# Altium PCB Test Power Module PCB.PcbDoc
Units mm, origin at the board's own origin, x right, y up, seen from the top; angles counter-clockwise.
Board outline 100 x 45 mm, 2 copper layers (Top Layer, Bottom Layer), stack 1.57 mm thick; 13 components, 6 nets, 24 pads, 0 vias.
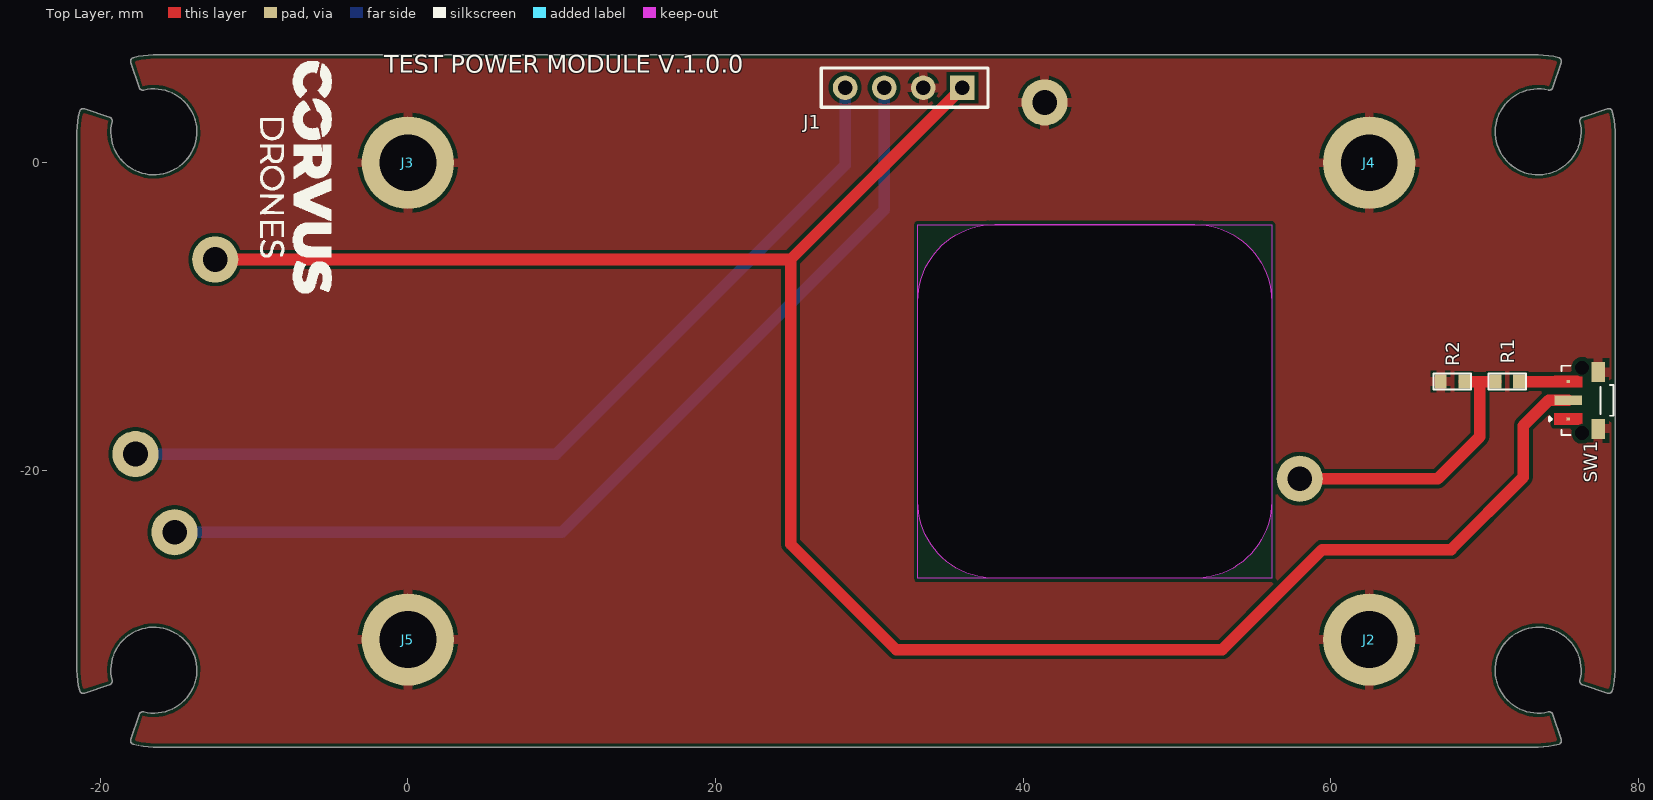
[diagram p0: Top Layer view]
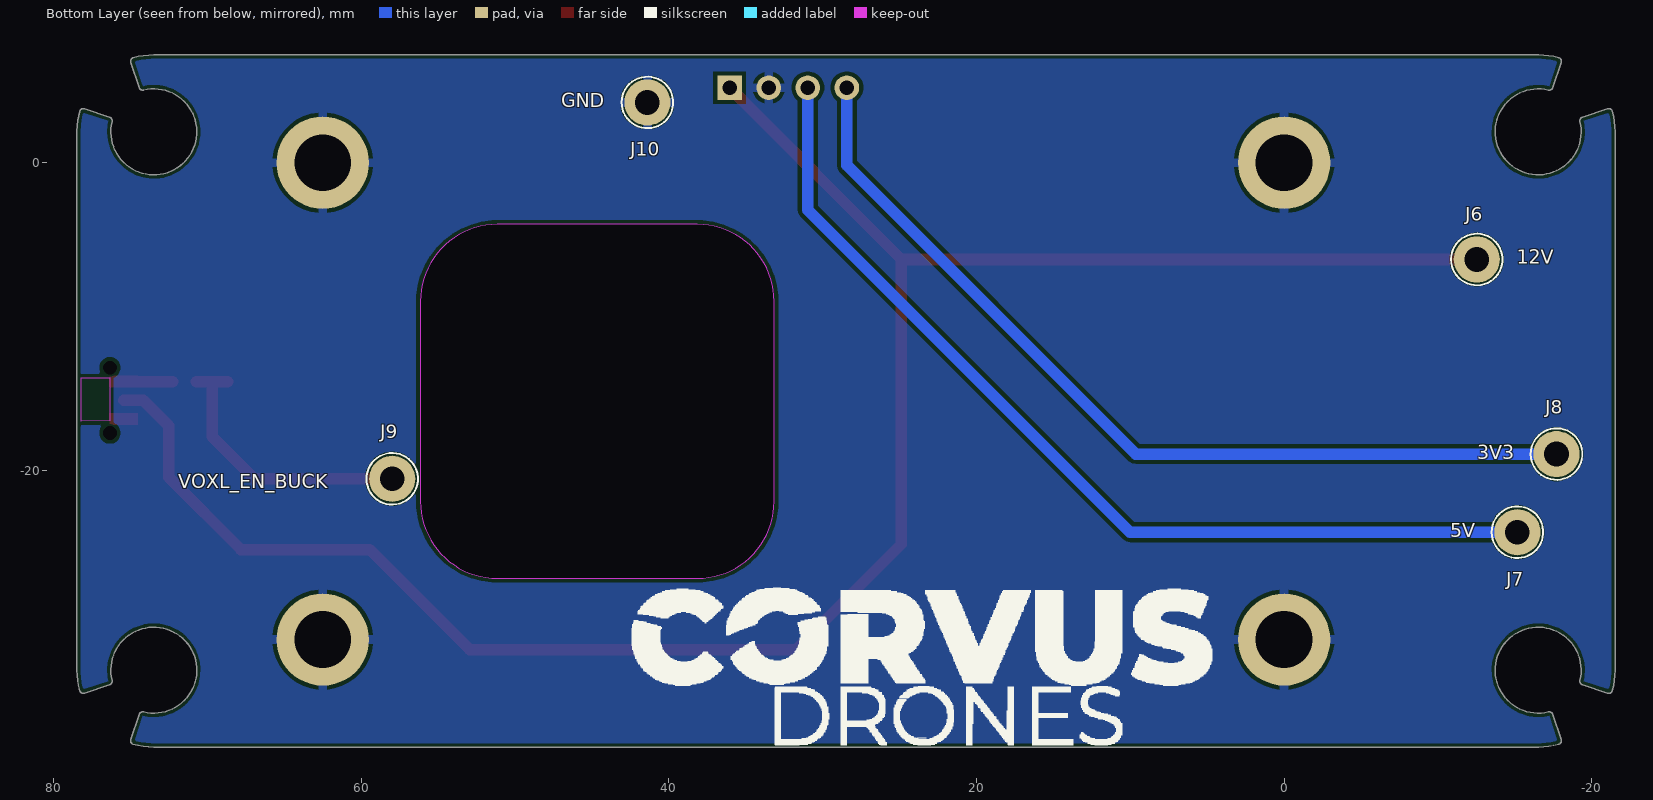
[diagram p1: Bottom Layer view, seen from below]
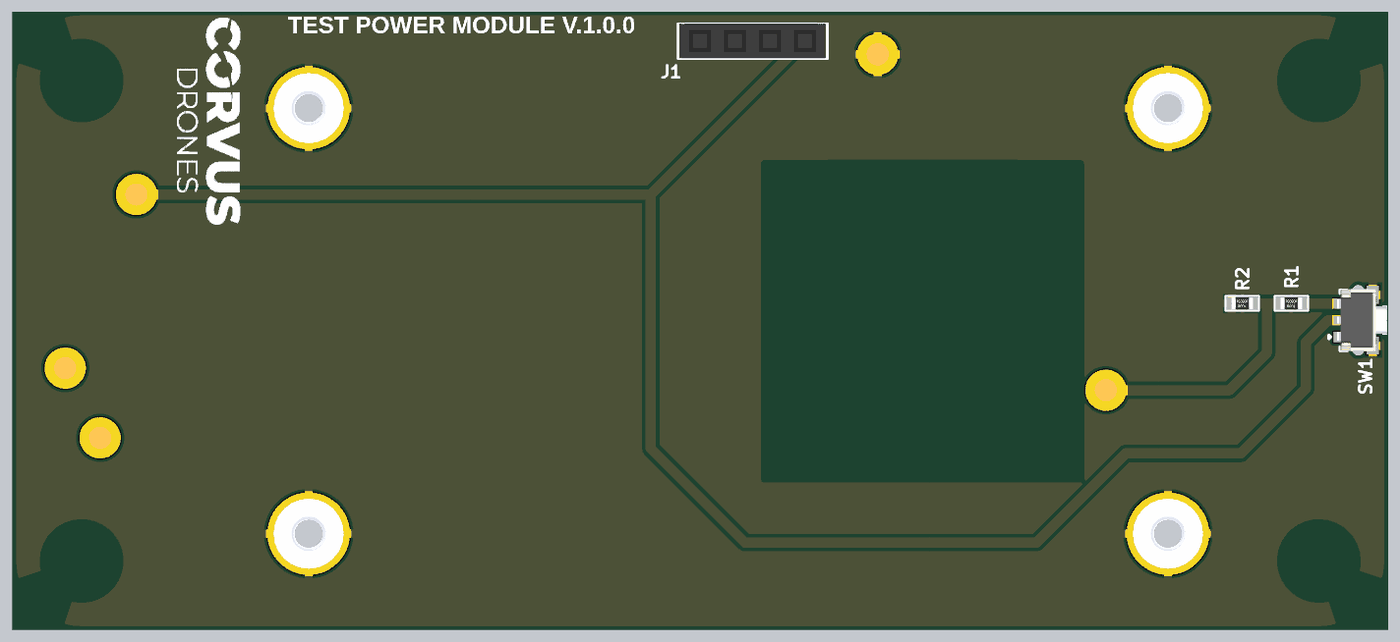
[diagram p2: 3D render of the assembled board from above, using the file's embedded part models]

## Layer stack, top to bottom
Top Solder: solder mask 0.01, Solder Resist, Dk 3.5
Top Layer: signal copper 0.035
Dielectric 1: dielectric 1.5, FR-4, Dk 4.8
Bottom Layer: signal copper 0.035
Bottom Solder: solder mask 0.01, Solder Resist, Dk 3.5

## Board outline
-21.019,-34.488 cw(c-21.098,-34.25) -21.339,-34.317 cw(c-16.52,-32.989) -21.519,-32.989 -21.519,2.011 cw(c-16.519,2.012) -21.339,3.34 cw(c-21.098,3.273) -21.019,3.511 -19.397,2.97 cw(c-19.476,2.733) -19.233,2.674 ccw(c-16.519,2.011) -13.955,0.901 -13.868,1.129 ccw(c-16.519,2.012) -17.181,4.726 cw(c-17.24,4.969) -17.478,4.89 -18.018,6.512 cw(c-17.781,6.591) -17.847,6.832 cw(c-16.518,2.012) -16.564,7.011 73.481,7.011 cw(c73.481,2.012) 74.82,6.829 cw(c74.743,6.591) 74.98,6.511 74.44,4.889 cw(c74.203,4.969) 74.15,4.724 74.13,4.729 ccw(c73.481,2.012) 72.598,-0.639 72.832,-0.706 ccw(c73.481,2.012) 76.195,2.674 cw(c76.438,2.733) 76.359,2.97 77.981,3.511 cw(c78.06,3.273) 78.303,3.335 cw(c73.481,2.012) 78.462,2.447 78.481,2.011 78.481,-32.989 cw(c73.481,-32.988) 78.295,-34.338 cw(c78.06,-34.25) 77.981,-34.488 76.359,-33.947 cw(c76.438,-33.71) 76.195,-33.651 ccw(c73.481,-32.988) 70.917,-31.878 70.83,-32.105 ccw(c73.481,-32.988) 74.143,-35.703 cw(c74.203,-35.946) 74.44,-35.867 74.98,-37.489 cw(c74.743,-37.568) 74.849,-37.794 74.851,-37.797 cw(c73.481,-32.988) 73.481,-37.988 -16.519,-37.988 -16.564,-37.988 cw(c-16.519,-32.989) -17.847,-37.809 cw(c-17.781,-37.568) -18.018,-37.489 -17.478,-35.867 cw(c-17.241,-35.946) -17.181,-35.703 ccw(c-16.519,-32.988) -13.868,-32.105 -13.955,-31.878 ccw(c-16.519,-32.988) -19.233,-33.651 cw(c-19.476,-33.71) -19.397,-33.947
cut-out: 33.148,-22.019 33.148,-9.011 cw(c38.148,-9.011) 38.148,-4.011 51.148,-4.011 cw(c51.148,-9.011) 56.148,-9.011 56.148,-22.019 cw(c51.148,-22.019) 51.148,-27.019 38.148,-27.019 cw(c38.148,-22.019)

## Design rules (kind name [scope] priority, off if disabled: settings)
BoardOutlineClearance [All] p1: gap=0 ignorepadtopadclearanceinfootprint=FALSE except(0.254: Poly-OutlineEdge)
Clearance [All] p1: gap=0.127 ignorepadtopadclearanceinfootprint=FALSE except(0.254: Arc-Poly Track-Poly SMDPad-Poly THPad-Poly Via-Poly Fill-Poly Poly-Poly Poly-Region)
DiffPairsRouting [All] p1: maxlimit=0.127 minlimit=0.127 mostfreqgap=0.127 toplayer_minwidth=0.203 toplayer_maxwidth=0.305 toplayer_prefwidth=0.203 bottomlayer_minwidth=0.203 bottomlayer_maxwidth=0.305 bottomlayer_prefwidth=0.203 maxuncoupledlength=12.7
HoleSize [All] p1: absolutevalues=TRUE maxlimit=25.4 minlimit=0.025 maxpercent=80.000 minpercent=20.000
HoleToHoleClearance [All] p1: gap=0.152 allowstackedmicrovias=TRUE
MinimumSolderMaskSliver [All] p1: minsoldermaskwidth=0
PolygonConnect [All] p1: connectstyle=Relief reliefconductorwidth=0.6 reliefentries=4 polygonreliefangle="90 Angle" airgapwidth=0.254
RoutingVias [All] p1: holewidth=0.3 width=0.6 viastyle="Through Hole" minholewidth=0.3 minwidth=0.6 maxholewidth=0.3 maxwidth=0.6
SilkToSilkClearance [All] p1: silktosilkclearance=0
SilkToSolderMaskClearance [IsPad] p1: minsilkscreentomaskgap=0 clearancetoexposedcopper=TRUE
SolderMaskExpansion SolderMaskExpansion_1 [IsVia] p1: expansion=0.102 istentingtop=TRUE
SolderMaskExpansion [All] p2: expansion=0.102 istentingtop=FALSE
UnRoutedNet [All] p1: checkbadconnections=TRUE
Width [All] p1: maxlimit=0.75 minlimit=0.254 preferedwidth=0.75 minimp=50.000000 maximp=50.000000 favimp=50.000000
23 further rules are at their usual default settings.

## Components (designator, comment, footprint, x,y, rotation, side; value= is the part's Value field where it differs from the comment)
J1 "C2718488" "HDR1X4 Female" 32.233,4.877 r180 top
J2 "9774050151R" SPACER 62.5,-31 r0 top
J3 "9774050151R" SPACER 0,0 r0 top
J4 "9774050151R" SPACER 62.5,0 r0 top
J5 "9774050151R" SPACER 0,-31 r0 top
J6 "YZ162317083P-01" YZ162317083P-01 -12.527,-6.289 r90 bottom
J7 "YZ162317083P-01" YZ162317083P-01 -15.169,-24.018 r180 bottom
J8 "YZ162317083P-01" YZ162317083P-01 -17.709,-18.938 r180 bottom
J9 "YZ162317083P-01" YZ162317083P-01 57.983,-20.549 r180 bottom
J10 "YZ162317083P-01" YZ162317083P-01 41.392,3.92 r180 bottom
R1 "30K" RES-0603 71.474,-14.223 r0 top
R2 "10K" RES-0603 67.906,-14.223 r0 top value=10kR
SW1 "TL3340AF160QG" TL3340AF160QG 76.412,-15.448 r90 top

## Footprints (in the part's own frame and the unit in brackets; to place one, negate y for a bottom-side part, rotate by r counter-clockwise, add the part's x,y. Pads: shape width x height; smd on the part's side, far side on the other; paste and mask are expansions set on the pad)
"HDR1X4 Female" [mm]
  rect 1.6x1.6 hole 0.95: 1(-3.81,0)
  round 1.6 hole 0.95: 2(-1.27,0) 3(1.27,0) 4(3.81,0)
  silkscreen extent -5.49,-1.27 5.36,1.27, body extent -5.38,-1.3 5.28,1.24, height 8.5
RES-0603 [mil]
  rect 30x35 smd: 1(-30,0) 2(30,0)
  silkscreen extent -48,-21 48,21, body extent -31,-17 31,17, height 18
SPACER [mm]
  round 6 hole 3.7: 1(0,0)
  body extent -2.55,-2.55 2.55,2.55, height 5.2
TL3340AF160QG [mm]
  rect 0.2x0.2 smd paste-1 mask+0: 1(-1.225,0.975) 3(1.225,0.975)
  rect 0.6x1.8 smd: 2(0,0.975)
  rect 1.3x0.9 smd: S1(-1.85,-0.975) S2(1.85,-0.975)
  round 0 hole 0.9 unplated: ""(-2.125,0.075) ""(2.125,0.075)
  Top Layer region: 1.6,0.375 1.6,0.365 1.595,0.358 1.587,0.343 1.579,0.327 1.572,0.311 1.569,0.302 1.565,0.292 1.557,0.271 1.551,0.25 1.545,0.228 1.543,0.218 1.54,0.209 1.536,0.191 1.533,0.173 1.531,0.155 1.53,0.146 1.53,0.146 1.529,0.138 1.526,0.12 1.525,0.102 1.525,0.084 1.525,0.075 0.85,0.075 0.85,1.875 1.6,1.875
  Top Layer region: -0.85,0.075 -1.525,0.075 -1.525,0.084 -1.525,0.102 -1.526,0.12 -1.529,0.138 -1.53,0.146 -1.53,0.146 -1.531,0.155 -1.533,0.173 -1.536,0.191 -1.54,0.209 -1.543,0.218 -1.545,0.228 -1.551,0.25 -1.557,0.271 -1.565,0.292 -1.569,0.302 -1.572,0.311 -1.579,0.327 -1.587,0.343 -1.595,0.358 -1.6,0.365 -1.6,0.375 -1.6,1.875 -0.85,1.875
  silkscreen extent -2.25,-1.97 2.25,2.21, body extent -2.25,-2.05 2.25,1.62, height 3.3
YZ162317083P-01 [mm]
  round 3 hole 1.6: 1(0,0)
  silkscreen extent -1.68,-1.67 1.68,1.68, body extent -1,-1 1,1, height 5

## Part data
J1: "2.54mm Plugin 3A bronze -40℃~+105℃ Straight 1x4P Top 4 Square Holes Plugin,P=2.54mm Female Headers ROHS", MANUFACTURER=BOOMELE, Package=Plugin,P=2.54mm, ComponentLink1Description=LCSC, ComponentLink1URL=https://www.lcsc.com/product-detail/Female-Headers_BOOMELE-Boom-Precision-Elec-C2718488_C2718488.html, Item Type=Header, LCSC Part Number=C2718488, Manufacturer Part Number=C2718488
J2 J3 J4 J5: "Spacer Material: Steel Mounting: SMT Series: WA-SMSI Thread D: M2.5", MANUFACTURER="Wurth Electronics", Max Operating Temperature=150°C, Min Operating Temperature=-55°C, Supplier Part Number=732-7095-1-ND, Category="Spacers, Standoffs", ComponentLink1Description=http://www.farnell.com/datasheets/1960373.pdf?src-supplier=Farnell, ComponentLink1URL=http://www.farnell.com/datasheets/1960373.pdf?src-supplier=Farnell, ComponentLink2Description=http://www.mouser.com/ds/2/445/9774050151R-611428.pdf?src-supplier=Mouser, ComponentLink2URL=http://www.mouser.com/ds/2/445/9774050151R-611428.pdf?src-supplier=Mouser, ComponentLink3Description=https://media.digikey.com/pdf/Data%20Sheets/Wurth%20Electronics%20PDFs/WA-SMSx_Performance_Flyer.pdf?src-supplier=Digikey, ComponentLink3URL=https://media.digikey.com/pdf/Data%20Sheets/Wurth%20Electronics%20PDFs/WA-SMSx_Performance_Flyer.pdf?src-supplier=Digikey, ComponentLink4Description=http://www.farnell.com/datasheets/1960373.pdf?src-supplier=Element14, ComponentLink4URL=http://www.farnell.com/datasheets/1960373.pdf?src-supplier=Element14, ComponentLink5Description=https://datasheet.octopart.com/9774050151R-W%C3%BCrth-Elektronik-datasheet-48588545.pdf?src-supplier=Element14, ComponentLink5URL=https://datasheet.octopart.com/9774050151R-W%C3%BCrth-Elektronik-datasheet-48588545.pdf?src-supplier=Element14, ComponentLink6Description=http://www.farnell.com/datasheets/1960373.pdf?src-supplier=Newark, ComponentLink6URL=http://www.farnell.com/datasheets/1960373.pdf?src-supplier=Newark, ComponentLink7Description=https://katalog.we-online.de/em/datasheet/9774050151R.pdf?src-supplier=Digikey, ComponentLink7URL=https://katalog.we-online.de/em/datasheet/9774050151R.pdf?src-supplier=Digikey, Height=5.1mm, Item Type=Spacer, Length=0.252inch, Manufacturer Part Number=9774050151R, Material=Steel, Outside Diameter=0.201inch, Packaging=10Packaging, Plating=Tin, Pricing="1=1.16, 10=1.098, 50=0.979, 100=0.895 (USD)", Reach SVHC Compliant=Unknown, RoHS=Yes, Series=WA-SMSI, Stock=39400, Supplier=Digikey, Threaded/Unthreaded=Threaded
J6 J7 J8 J9 J10: "Brass 12V -40℃~+85℃ 单PINBit 弹簧顶针(POGO PIN) 8.3mm 50mΩ 10000次 4.28mm 2A Gold - Pogo Pin Spring Probe Connector ROHS", LCSC Part Number=C5157268, MANUFACTURER=Xinyangze, Package=-, ComponentLink1Description=LCSC, ComponentLink1URL=https://www.lcsc.com/product-detail/Pogo-Pin-Spring-Probe-Connector_Xinyangze-YZ162317083P-01_C5157268.html, Item Type="Pogo Pin Spring Probe Connector", Manufacturer Part Number=YZ162317083P-01
R1: library part RC0603FR-0730KL, "RES 30K OHM 1% 1/10W 0603", LCSC Part Number=C100001, Supplier Part Number 1=311-30.0KHRCT-ND, Supplier 1=Digi-Key
R2: library part RT0603BRD0710KL, "RES SMD 10K OHM 0.1% 1/10W 0603", Case/Package=0603, LCSC Part Number=C95204, MANUFACTURER=Yageo, Max Operating Temperature=155°C, Min Operating Temperature=-55°C, Package Height=0.45mm, Package Length=1.6mm, Package Style=SMTMeter, Package Width=0.8mm, Power=100mW, Rated Temperature=70°C, Resistor Type="FIXED RESISTOR", Supplier Part Number 1=1991391P, Temperature Coefficient=25ppm/°C, Tolerance=0.1%, Working Voltage=75V, Category="Chip SMD Resistors", ComponentLink1Description=https://datasheet.ciiva.com:443/pdfs/VipMasterIC/IC/YAGO/YAGO-S-A0008510989/YAGO-S-A0008510989-1.pdf?src-supplier=IHS+Markit, ComponentLink1URL=https://datasheet.ciiva.com:443/pdfs/VipMasterIC/IC/YAGO/YAGO-S-A0008510989/YAGO-S-A0008510989-1.pdf?src-supplier=IHS+Markit, ComponentLink2Description=https://datasheet.ciiva.com/5624/pyu-rt-1-to-0-05-rohs-l-4-5624351.pdf?src-supplier=Mouser, ComponentLink2URL=https://datasheet.ciiva.com/5624/pyu-rt-1-to-0-05-rohs-l-4-5624351.pdf?src-supplier=Mouser, ComponentLink3Description=https://datasheet.ciiva.com/29721/pyu-rt-1-to-0-05-rohs-l-4-29721177.pdf?src-supplier=Digi-Key, ComponentLink3URL=https://datasheet.ciiva.com/29721/pyu-rt-1-to-0-05-rohs-l-4-29721177.pdf?src-supplier=Digi-Key, Construction=Chip, Item Type=Resistor, Manufacturer Part Number=RT0603BRD0710KL, Mounting Technology="Surface Mount", Packaging="Tape and Reel", Pins=2, Pricing 1="100=0.29800, 250=0.27800, 500=0.25900, 1000=0.23700 (GBP)", Reach SVHC Compliant=Yes, RoHS=Yes, RoHS Compliant=Yes, Stock 1=20510, Supplier 1=Rs, Technology="THIN FILM", Termination=Wraparound
SW1: "SWITCH TACTILE SPST-NO 0.05A 12V", Case/Package=SMD/SMT, Color=White, Contact Current Rating=50mA, Contact Resistance=500mR, LCSC Part Number=C2886925, MANUFACTURER=E-Switch, Max Operating Temperature=85°C, Max Voltage Rating (DC)=12V, Min Operating Temperature=-35°C, Operating Force=160gf, Package Quantity=1, Supplier Part Number=EG4627CT-ND, Actuator Length=0.85mm, Actuator Material=Polyphthalamide, Actuator Type=Standard, Category="Tactile Switches", ComponentLink1Description=https://datasheet.ciiva.com/7637/tl3340-7637667.pdf?src-supplier=Element14, ComponentLink1URL=https://datasheet.ciiva.com/7637/tl3340-7637667.pdf?src-supplier=Element14, ComponentLink2Description=https://datasheet.ciiva.com/5284/tl3340-28153-5284108.pdf?src-supplier=Mouser, ComponentLink2URL=https://datasheet.ciiva.com/5284/tl3340-28153-5284108.pdf?src-supplier=Mouser, ComponentLink3Description=https://datasheet.ciiva.com/2900/p021301b-2900825.pdf?src-supplier=Digikey, ComponentLink3URL=https://datasheet.ciiva.com/2900/p021301b-2900825.pdf?src-supplier=Digikey, ComponentLink4Description=https://datasheet.ciiva.com/2900/p021301b-2900826.pdf?src-supplier=Digikey, ComponentLink4URL=https://datasheet.ciiva.com/2900/p021301b-2900826.pdf?src-supplier=Digikey, ComponentLink5Description=https://datasheet.ciiva.com/2900/p021301b-2900827.pdf?src-supplier=Digikey, ComponentLink5URL=https://datasheet.ciiva.com/2900/p021301b-2900827.pdf?src-supplier=Digikey, Contact Material="Stainless Steel,Silver", Contact Plating="Stainless Steel,Silver", Current Rating=50mA, Electrical Life=100000Cycles, Height=3.55mm, Housing Material=Polyphthalamide, Illumination Type=Non-Illuminated,Illuminated, Item Type="Tactile Switch", Lead Free=5697LeadFree, Manufacturer Part Number=TL3340AF160QG, Mechanical Life=100000Cycles, Mounting Technology="Surface Mount", Number of Positions=2NUMBER, Orientation="Right Angle", Packaging="Tape and Reel", Pricing="1=0.54, 10=0.521, 25=0.5016, 100=0.434, 250=0.39548, 500=0.36652, 1000=0.32795 (USD)", Reach SVHC Compliant=No, RoHS=Yes, RoHS Compliant=Yes, Series=TL3340, Size=3.3mm, Stock=110635, Supplier=Digikey, Switch Function=Off-Mom, Switch Travel=0.2mm, Termination="Gull Wing", Throw Configuration=SPST, Voltage Rating (DC)=12V

## Nets (pads, with @x,y where several pads share a name; then routed paths per layer and width w, separated by ;. In a path a pad name is that pad's centre, name@x,y a point inside that pad or via, vN(x,y) a via of type N, cw(c..) or ccw(c..) an arc to the next point about the centre after c; other vN are vias at no path point)
+3.3V: J1.4 J8.1 | length 58.9
  Bottom Layer w0.75: J8.1 9.637,-18.938 28.423,-0.152 J1.4
+5V: J1.3 J7.1 | length 62.8
  Bottom Layer w0.75: J7.1 10.018,-24.018 30.963,-3.073 J1.3
"+12V (VBATT)": J1.1 J6.1 SW1.2 | length 133.8
  Top Layer w0.75: J6.1 24.877,-6.289 ; J1.1 24.877,-6.289 ; SW1.2 74.166,-15.448 72.517,-17.097 72.517,-20.447 67.818,-25.146 59.436,-25.146 52.933,-31.649 31.734,-31.649 24.877,-24.791 24.877,-6.289
GND: J1.2 J2.1 J3.1 J4.1 J5.1 J10.1 R2.1 SW1.S1 SW1.S2 | length 0.2
  Top Layer w0.635: J10.1 J10.1@41.501,3.81
NetR1_2: R1.2 SW1.3 | length 3.2
  Top Layer w0.75: R1.2 SW1.3
VOXL_EN_BUCK: J9.1 R1.1 R2.2 | length 18.5
  Top Layer w0.75: J9.1 66.954,-20.549 69.69,-17.813 69.69,-14.223 ; R2.2 69.69,-14.223 ; R1.1 69.69,-14.223
pads on no net: SW1. SW1.1

## Polygon pours and split planes (outlines as drawn)
GND on Bottom Layer "GND_L02_P001" (solid, pour order 1): -21.019,-34.488 cw(c-21.098,-34.25) -21.339,-34.317 cw(c-16.52,-32.989) -21.519,-32.989 -21.519,2.011 cw(c-16.519,2.012) -21.339,3.34 cw(c-21.098,3.273) -21.019,3.511 -19.397,2.97 cw(c-19.476,2.733) -19.233,2.674 ccw(c-16.519,2.011) -17.181,4.726 cw(c-17.24,4.969) -17.478,4.89 -18.018,6.512 cw(c-17.781,6.591) -17.847,6.832 cw(c-16.518,2.012) -16.564,7.011 73.481,7.011 cw(c73.481,2.012) 74.82,6.829 cw(c74.743,6.591) 74.98,6.511 74.44,4.889 cw(c74.203,4.969) 74.15,4.724 74.13,4.729 ccw(c73.481,2.012) 76.195,2.674 cw(c76.438,2.733) 76.359,2.97 77.981,3.511 cw(c78.06,3.273) 78.303,3.335 cw(c73.481,2.012) 78.462,2.447 78.481,2.011 78.481,-32.989 cw(c73.481,-32.988) 78.295,-34.338 cw(c78.06,-34.25) 77.981,-34.488 76.359,-33.947 cw(c76.438,-33.71) 76.195,-33.651 ccw(c73.481,-32.988) 74.144,-35.703 74.143,-35.703 cw(c74.203,-35.946) 74.44,-35.867 74.98,-37.489 cw(c74.743,-37.568) 74.849,-37.794 74.851,-37.797 cw(c73.481,-32.988) 73.481,-37.988 -16.519,-37.988 -16.564,-37.988 cw(c-16.519,-32.989) -17.847,-37.809 cw(c-17.781,-37.568) -18.018,-37.489 -17.478,-35.867 cw(c-17.241,-35.946) -17.181,-35.703 ccw(c-16.519,-32.988) -19.233,-33.651 cw(c-19.476,-33.71) -19.397,-33.947
GND on Top Layer "GND_L01_P000" (solid, pour order 0): -21.019,-34.488 cw(c-21.098,-34.25) -21.339,-34.317 cw(c-16.52,-32.989) -21.519,-32.989 -21.519,2.011 cw(c-16.519,2.012) -21.339,3.34 cw(c-21.098,3.273) -21.019,3.511 -19.397,2.97 cw(c-19.476,2.733) -19.233,2.674 ccw(c-16.519,2.011) -17.181,4.726 cw(c-17.24,4.969) -17.478,4.89 -18.018,6.512 cw(c-17.781,6.591) -17.847,6.832 cw(c-16.518,2.012) -16.564,7.011 73.481,7.011 cw(c73.481,2.012) 74.82,6.829 cw(c74.743,6.591) 74.98,6.511 74.44,4.889 cw(c74.203,4.969) 74.15,4.724 74.13,4.729 ccw(c73.481,2.012) 76.195,2.674 cw(c76.438,2.733) 76.359,2.97 77.981,3.511 cw(c78.06,3.273) 78.303,3.335 cw(c73.481,2.012) 78.462,2.447 78.481,2.011 78.481,-32.989 cw(c73.481,-32.988) 78.295,-34.338 cw(c78.06,-34.25) 77.981,-34.488 76.359,-33.947 cw(c76.438,-33.71) 76.195,-33.651 ccw(c73.481,-32.988) 74.144,-35.703 74.143,-35.703 cw(c74.203,-35.946) 74.44,-35.867 74.98,-37.489 cw(c74.743,-37.568) 74.849,-37.794 74.851,-37.797 cw(c73.481,-32.988) 73.481,-37.988 -16.519,-37.988 -16.564,-37.988 cw(c-16.519,-32.989) -17.847,-37.809 cw(c-17.781,-37.568) -18.018,-37.489 -17.478,-35.867 cw(c-17.241,-35.946) -17.181,-35.703 ccw(c-16.519,-32.988) -19.233,-33.651 cw(c-19.476,-33.71) -19.397,-33.947

## Keep-outs
Top Layer:
  region: 33.148,-4.039 56.148,-4.039 56.148,-27.019 33.148,-27.019
Bottom Layer:
  region: 78.203,-16.805 78.203,-13.97 76.337,-13.97 76.337,-16.783

## Other copper
Top Layer:
  pour cut-out: 78.203,-16.648 76.35,-16.648 76.35,-14.248 78.203,-14.248

## Silkscreen, mask and mechanical layers (free items; w line width, h text height)
Top Overlay:
  drawing of 1844 lines, arcs and shapes, not listed
  text "TEST POWER MODULE V.1.0.0" at -1.524,5.461 h1.97
Bottom Overlay:
  drawing of 1844 lines, arcs and shapes, not listed
  text "GND" at 46.99,3.302 h1.52
  text "12V" at -15.113,-6.858 h1.52
  text "3V3" at -12.558,-19.558 h1.52
  text "VOXL_EN_BUCK" at 71.882,-21.463 h1.52
  text "5V" at -10.795,-24.638 h1.52
Dimensions:
  lines w0.152: 28.392,-22.875 cw(c29.027,-22.875) 29.027,-22.24 ; 28.392,-22.875 cw(c29.027,-22.875) 29.027,-22.24 ; 28.392,-22.875 ccw(c29.027,-22.875) 29.027,-23.51 ; 28.392,-22.875 ccw(c29.027,-22.875) 29.027,-23.51 ; 28.392,-20.335 cw(c29.027,-20.335) 29.027,-19.7 ; 28.392,-20.335 cw(c29.027,-20.335) 29.027,-19.7 ; 28.392,-20.335 ccw(c29.027,-20.335) 29.027,-20.97 ; 28.392,-20.335 ccw(c29.027,-20.335) 29.027,-20.97 ; 28.392,-17.795 cw(c29.027,-17.795) 29.027,-17.16 ; 28.392,-17.795 cw(c29.027,-17.795) 29.027,-17.16 ; 28.392,-17.795 ccw(c29.027,-17.795) 29.027,-18.43 ; 28.392,-17.795 ccw(c29.027,-17.795) 29.027,-18.43 ; 29.027,-23.51 54.427,-23.51 ; 29.027,-23.51 54.427,-23.51 ; 29.027,-22.24 54.427,-22.24 ; 29.027,-22.24 54.427,-22.24 ; 29.027,-20.97 54.427,-20.97 ; 29.027,-20.97 54.427,-20.97 ; 29.027,-19.7 54.427,-19.7 ; 29.027,-19.7 54.427,-19.7 ; 29.027,-18.43 54.427,-18.43 ; 29.027,-18.43 54.427,-18.43 ; 29.027,-17.16 54.427,-17.16 ; 29.027,-17.16 54.427,-17.16 ; 54.427,-23.51 ccw(c54.427,-22.875) 55.062,-22.875 ; 54.427,-23.51 ccw(c54.427,-22.875) 55.062,-22.875 ; 54.427,-22.24 cw(c54.427,-22.875) 55.062,-22.875 ; 54.427,-22.24 cw(c54.427,-22.875) 55.062,-22.875 ; 54.427,-20.97 ccw(c54.427,-20.335) 55.062,-20.335 ; 54.427,-20.97 ccw(c54.427,-20.335) 55.062,-20.335 ; 54.427,-19.7 cw(c54.427,-20.335) 55.062,-20.335 ; 54.427,-19.7 cw(c54.427,-20.335) 55.062,-20.335 ; 54.427,-18.43 ccw(c54.427,-17.795) 55.062,-17.795 ; 54.427,-18.43 ccw(c54.427,-17.795) 55.062,-17.795 ; 54.427,-17.16 cw(c54.427,-17.795) 55.062,-17.795 ; 54.427,-17.16 cw(c54.427,-17.795) 55.062,-17.795 ; 34.234,-25.415 cw(c34.869,-25.415) 34.869,-24.78 54.427,-24.78 cw(c54.427,-25.415) 55.062,-25.415 cw(c54.427,-25.415) 54.427,-26.05 34.869,-26.05 cw(c34.869,-25.415) 34.234,-25.415
  lines w0.5: 33.148,-4.039 33.148,-26.989 56.148,-26.989 56.148,-4.039 ; 33.148,-4.011 56.148,-4.011
Board_outline:
  lines w0.152: -21.519,-32.989 ccw(c-16.52,-32.989) -21.339,-34.317 ccw(c-21.098,-34.25) -21.019,-34.488 -19.397,-33.947 ccw(c-19.476,-33.71) -19.233,-33.651 cw(c-16.519,-32.988) -17.181,-35.703 ccw(c-17.241,-35.946) -17.478,-35.867 -18.018,-37.489 ccw(c-17.781,-37.568) -17.847,-37.809 ccw(c-16.519,-32.989) -16.564,-37.988 -16.519,-37.988 73.481,-37.988 ccw(c73.481,-32.988) 74.851,-37.797 74.849,-37.794 ccw(c74.743,-37.568) 74.98,-37.489 74.44,-35.867 ccw(c74.203,-35.946) 74.143,-35.703 cw(c73.481,-32.988) 76.195,-33.651 ccw(c76.438,-33.71) 76.359,-33.947 77.981,-34.488 ccw(c78.06,-34.25) 78.295,-34.338 78.295,-34.338 ccw(c73.481,-32.988) 78.481,-32.989 78.481,2.011 78.462,2.447 ccw(c73.48,2.012) 78.303,3.335 ccw(c78.06,3.273) 77.981,3.511 76.359,2.97 ccw(c76.438,2.733) 76.195,2.674 cw(c73.481,2.012) 74.13,4.729 74.15,4.724 ccw(c74.203,4.969) 74.44,4.889 74.98,6.511 ccw(c74.743,6.591) 74.82,6.829 ccw(c73.481,2.012) 73.481,7.011 -16.519,7.011 -16.564,7.011 ccw(c-16.518,2.012) -17.847,6.832 ccw(c-17.781,6.591) -18.018,6.512 -17.478,4.89 ccw(c-17.24,4.969) -17.181,4.726 cw(c-16.519,2.011) -19.233,2.674 ccw(c-19.476,2.733) -19.397,2.97 -21.019,3.511 ccw(c-21.098,3.273) -21.339,3.34 ccw(c-16.519,2.012) -21.519,2.011 -21.519,-32.989
  lines w0.254: 33.148,-22.019 ccw(c38.148,-22.019) 38.148,-27.019 51.148,-27.019 ccw(c51.148,-22.019) 56.148,-22.019 56.148,-9.011 ccw(c51.148,-9.011) 51.148,-4.011 38.148,-4.011 ccw(c38.148,-9.011) 33.148,-9.011 33.148,-22.019
Fabrication:
  drawing of 191 lines, arcs and shapes, not listed
  text "Layer" at 95.379,-4 h1.52
  text "Name" at 105.791,-4 h1.52
  text "Material" at 129.407,-4 h1.52
  text "Thickness" at 151.245,-4 h1.52
  text "Constant" at 167.75,-4 h1.52
  text "Board Layer Stack" at 182.225,-4 h1.52
  text "Top Overlay" at 105.791,-7.048 h1.52
  text "Top Solder" at 105.791,-10.096 h1.52
  text "Solder Resist" at 129.407,-10.096 h1.52
  text "0.010mm" at 151.245,-10.096 h1.52
  text "3.5" at 167.75,-10.096 h1.52
  text "1" at 95.379,-13.144 h1.52
  text "Top Layer" at 105.791,-13.144 h1.52
  text "0.035mm" at 151.245,-13.144 h1.52
  text "Dielectric 1" at 105.791,-16.192 h1.52
  text "FR-4" at 129.407,-16.192 h1.52
  text "1.500mm" at 151.245,-16.192 h1.52
  text "4.8" at 167.75,-16.192 h1.52
  text "2" at 95.379,-19.24 h1.52
  text "Bottom Layer" at 105.791,-19.24 h1.52
  text "0.035mm" at 151.245,-19.24 h1.52
  text "Bottom Solder" at 105.791,-22.288 h1.52
  text "Solder Resist" at 129.407,-22.288 h1.52
  text "0.010mm" at 151.245,-22.288 h1.52
  text "3.5" at 167.75,-22.288 h1.52
  text "Bottom Overlay" at 105.791,-25.336 h1.52
  text "Total board thickness:" at 95.379,-28.384 h1.52
  text "1.590mm" at 151.245,-28.384 h1.52
Drill Drawing:
  circle w0.254: c96.155,19.833 r0.847
  lines w0.254: 95.308,16.87 97.002,16.87 96.155,15.177 95.308,16.87 ; 95.308,23.22 95.732,23.22 96.155,22.797 96.578,23.22 97.002,23.22 96.578,23.643 97.002,24.066 96.578,24.066 96.155,24.49 95.732,24.066 95.308,24.066 95.732,23.643 95.308,23.22 ; 95.308,26.607 97.002,26.607 97.002,28.3 95.308,28.3 95.308,26.607
  lines w0.381: 93.789,14.034 271.592,14.034 ; 93.789,29.274 271.592,29.274 ; 107.782,10.223 107.782,33.084 ; 121.24,10.223 121.24,33.084 ; 150.442,10.223 150.442,33.084 ; 163.291,10.223 163.291,33.084 ; 181.93,10.223 181.93,33.084 ; 220.018,10.223 220.018,33.084 ; 235,10.223 235,33.084 ; 253.944,10.223 253.944,33.084 ; 93.789,10.223 271.592,10.223 271.592,33.084 93.789,33.084 93.789,10.223
  text "Symbol" at 96.075,30.417 h1.83
  text "Count" at 108.925,30.417 h1.83
  text "Hole Size" at 122.383,30.417 h1.83
  text "Plated" at 151.585,30.417 h1.83
  text "Hole Type" at 164.434,30.417 h1.83
  text "Drill Layer Pair" at 183.073,30.417 h1.83
  text "Via/Pad" at 221.161,30.417 h1.83
  text "Pad Shape" at 236.143,30.417 h1.83
  text "Template" at 255.087,30.417 h1.83
  text "2" at 108.925,26.607 h1.52
  text "35.43mil (0.900mm)" at 122.383,26.607 h1.52
  text "NPTH" at 151.585,26.607 h1.52
  text "Round" at 164.434,26.607 h1.52
  text "Top Layer - Bottom Layer" at 183.073,26.607 h1.52
  text "Pad" at 221.161,26.607 h1.52
  text "Rounded" at 236.143,26.607 h1.52
  text "c0hn90" at 255.087,26.607 h1.52
  text "4" at 108.925,22.797 h1.52
  text "37.40mil (0.950mm)" at 122.383,22.797 h1.52
  text "PTH" at 151.585,22.797 h1.52
  text "Round" at 164.434,22.797 h1.52
  text "Top Layer - Bottom Layer" at 183.073,22.797 h1.52
  text "Pad" at 221.161,22.797 h1.52
  text "(Mixed)" at 236.143,22.797 h1.52
  text "(Mixed)" at 255.087,22.797 h1.52
  text "5" at 108.925,18.987 h1.52
  text "62.99mil (1.600mm)" at 122.383,18.987 h1.52
  text "PTH" at 151.585,18.987 h1.52
  text "Round" at 164.434,18.987 h1.52
  text "Top Layer - Bottom Layer" at 183.073,18.987 h1.52
  text "Pad" at 221.161,18.987 h1.52
  text "Rounded" at 236.143,18.987 h1.52
  text "c300h160" at 255.087,18.987 h1.52
  text "4" at 108.925,15.177 h1.52
  text "145.67mil (3.700mm)" at 122.383,15.177 h1.52
  text "PTH" at 151.585,15.177 h1.52
  text "Round" at 164.434,15.177 h1.52
  text "Top Layer - Bottom Layer" at 183.073,15.177 h1.52
  text "Pad" at 221.161,15.177 h1.52
  text "Rounded" at 236.143,15.177 h1.52
  text "c600h370" at 255.087,15.177 h1.52
  text "15 Total" at 108.925,11.367 h1.52

## Dimensions
-21.519,2.011 to 78.481,2.011 on Dimensions
73.481,7.011 to 73.481,-37.988 on Dimensions
73.481,7.011 to 51.148,-4.011 on Dimensions
38.148,-4.011 to 38.148,-27.019 on Dimensions
51.148,-27.019 to 73.481,-37.988 on Dimensions
33.148,-9.011 to 56.148,-9.011 on Dimensions
55.062,-17.795 to 28.392,-17.795 on Dimensions
78.237,3.45 to 78.295,-34.338 on Dimensions
-17.958,6.768 to 74.92,6.768 on Dimensions